# Altium PCB Orion-Bridge-R4.PcbDoc (part 1 of 2)
Units mil, origin at the board's own origin, x right, y up, seen from the top; angles counter-clockwise.
Board outline 1889.76 x 1259.84 mil, 2 copper layers (Top Layer, Bottom Layer), stack 62.992 mil thick; 52 components, 35 nets, 164 pads, 41 vias.
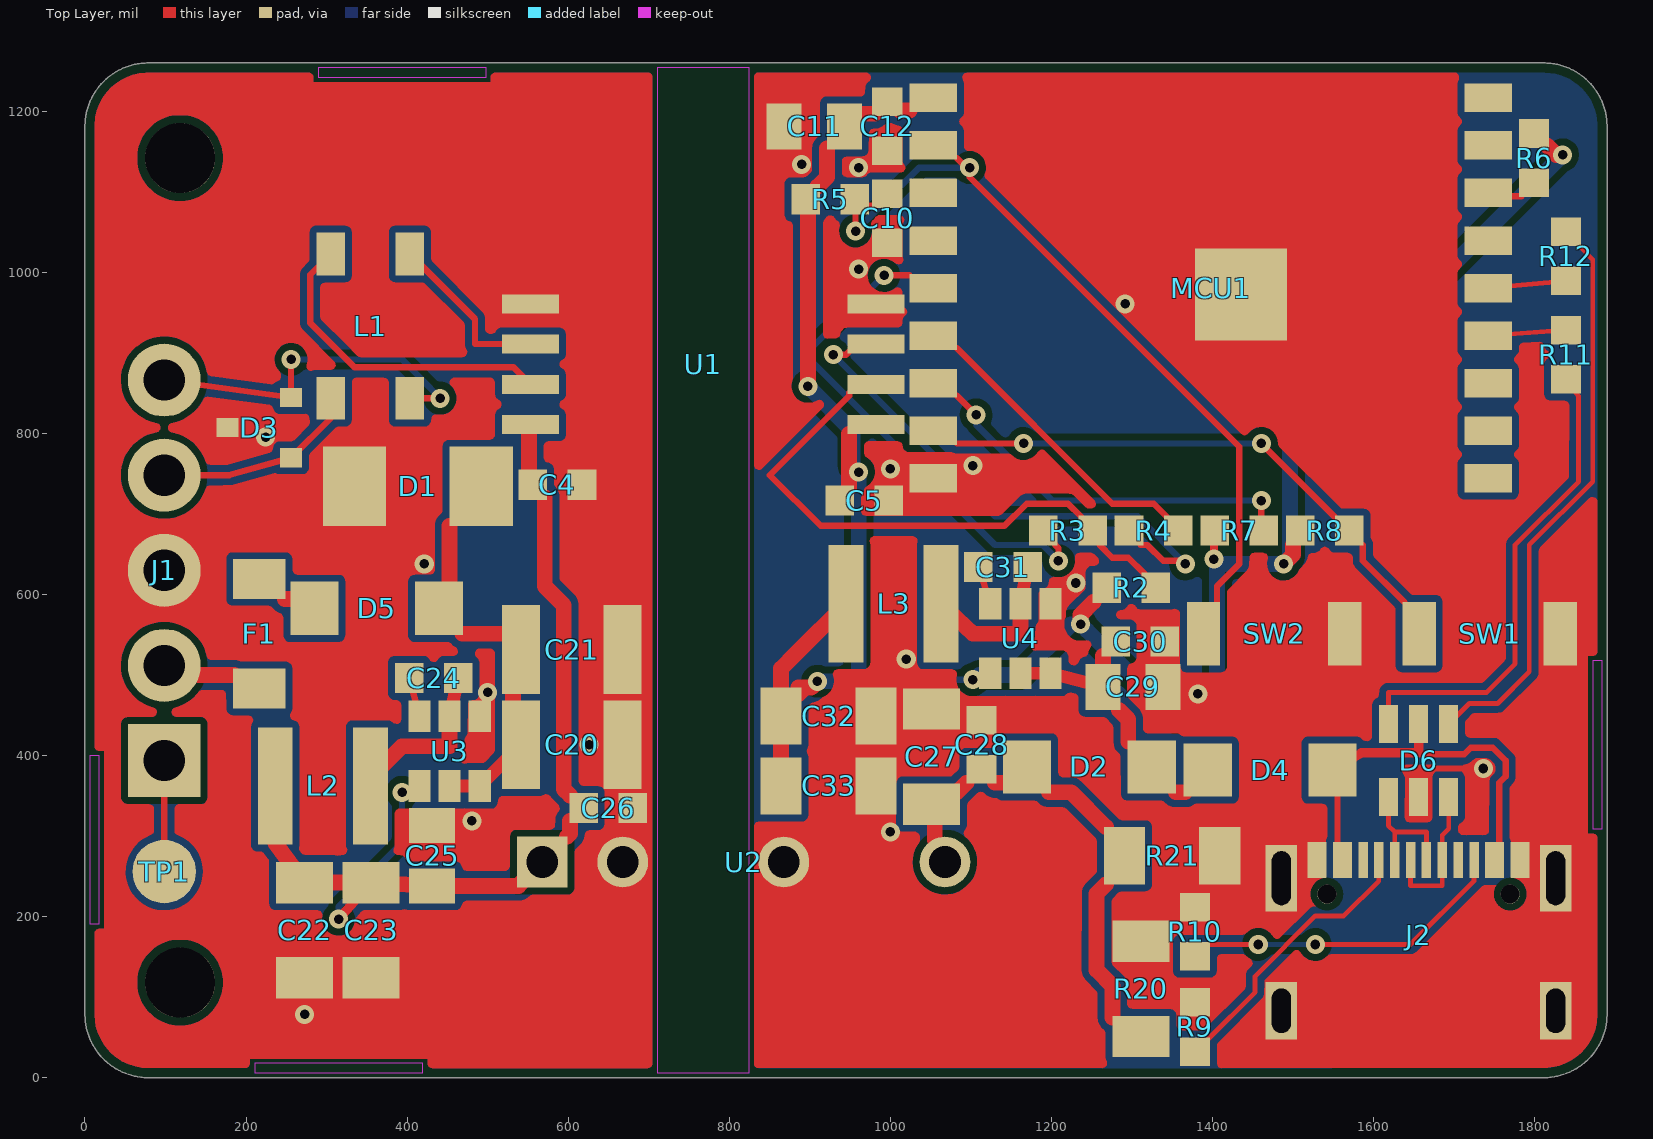
[diagram p0: Top Layer view]
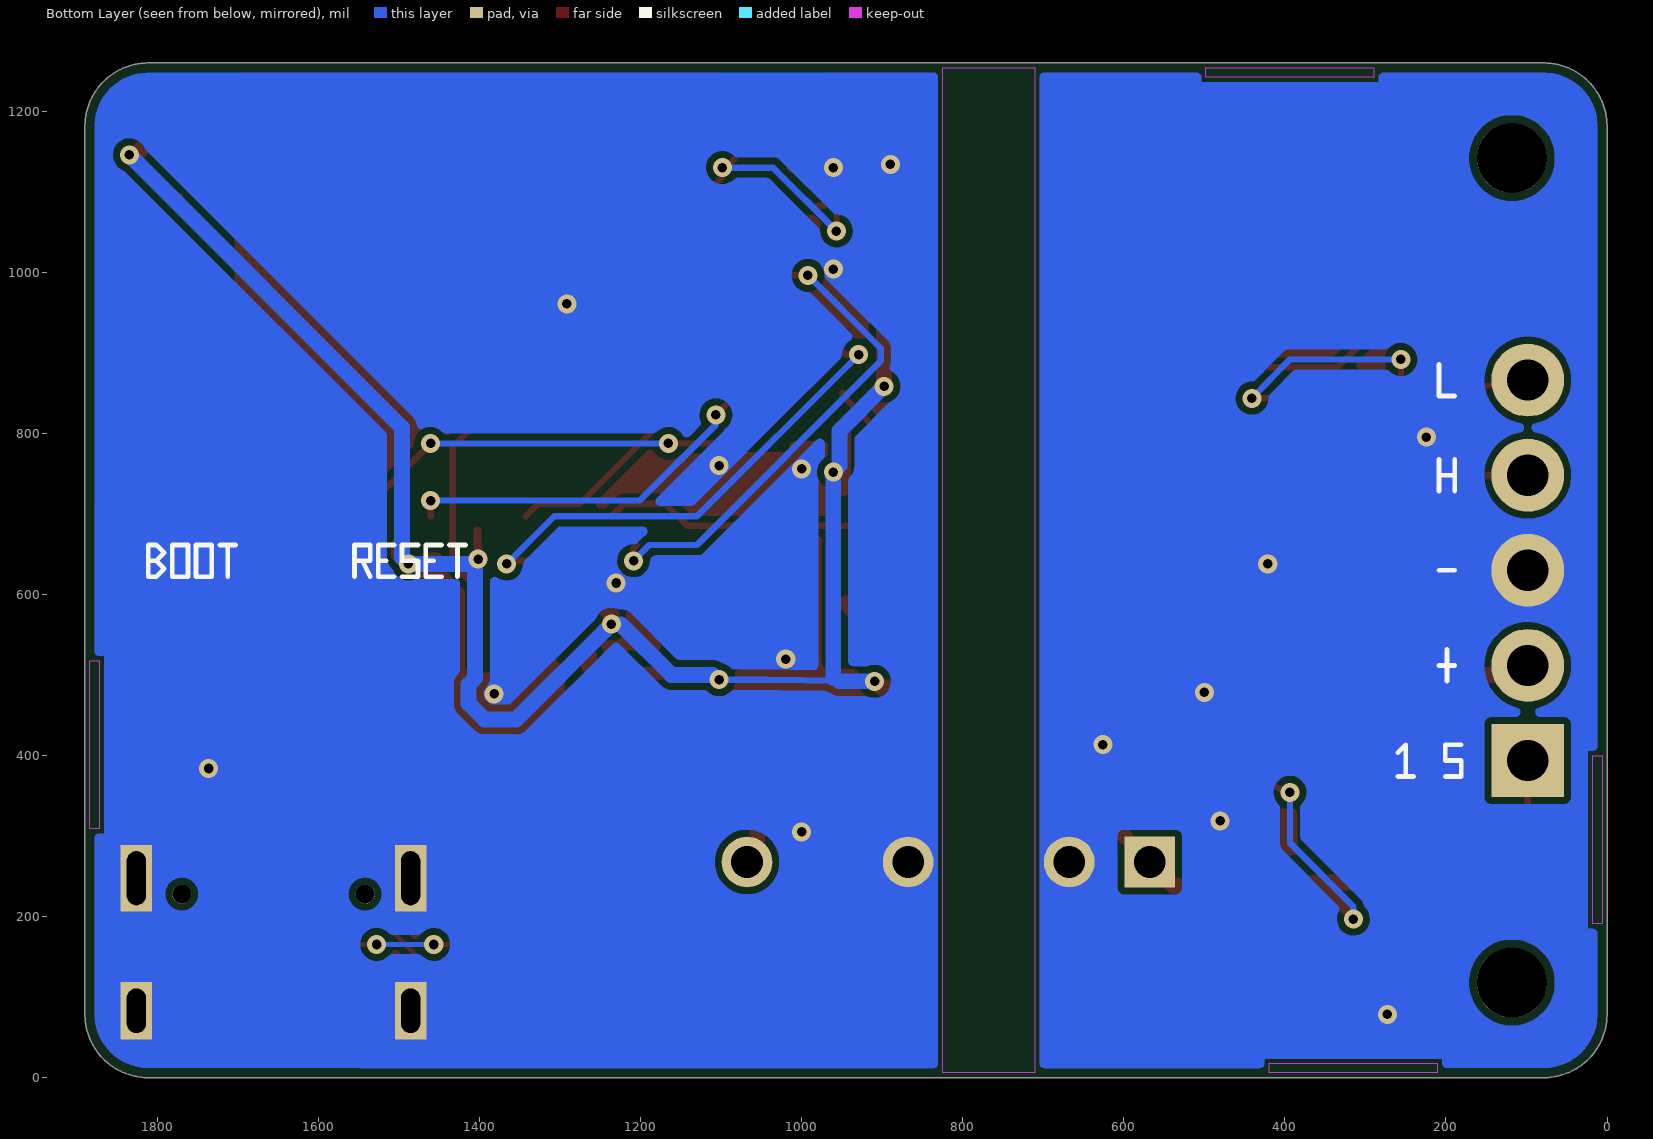
[diagram p1: Bottom Layer view, seen from below]

## Layer stack, top to bottom
Top Solder: solder mask 0.3937, Solder Resist, Dk 3.5
Top Layer: signal copper 1.378
Dielectric1: dielectric 60.2362, FR-4, Dk 4.3
Bottom Layer: signal copper 1.378
Bottom Solder: solder mask 0.3937, Solder Resist, Dk 3.5

## Board outline
1811.02,0 1812.96,0.02 1814.89,0.09 1816.82,0.21 1818.74,0.38 1820.66,0.59 1822.58,0.85 1824.49,1.16 1826.39,1.51 1828.28,1.91 1830.16,2.36 1832.02,2.85 1833.88,3.39 1835.72,3.97 1837.55,4.6 1839.36,5.28 1841.16,5.99 1842.93,6.76 1844.69,7.56 1846.43,8.41 1848.14,9.3 1849.83,10.23 1851.5,11.2 1853.15,12.22 1854.77,13.27 1856.36,14.36 1857.93,15.5 1859.47,16.67 1860.98,17.87 1862.45,19.12 1863.9,20.4 1865.32,21.71 1866.7,23.06 1868.05,24.45 1869.37,25.86 1870.65,27.31 1871.89,28.79 1873.1,30.3 1874.27,31.83 1875.4,33.4 1876.49,34.99 1877.55,36.61 1878.56,38.26 1879.53,39.93 1880.47,41.62 1881.36,43.34 1882.2,45.07 1883.01,46.83 1883.77,48.61 1884.49,50.4 1885.16,52.21 1885.79,54.04 1886.37,55.88 1886.91,57.74 1887.4,59.61 1887.85,61.49 1888.25,63.38 1888.6,65.28 1888.91,67.19 1889.17,69.1 1889.38,71.02 1889.55,72.95 1889.67,74.88 1889.74,76.81 1889.76,78.74 1889.76,1181.1 1889.74,1183.03 1889.67,1184.97 1889.55,1186.89 1889.38,1188.82 1889.17,1190.74 1888.91,1192.66 1888.6,1194.56 1888.25,1196.46 1887.85,1198.35 1887.4,1200.23 1886.91,1202.1 1886.37,1203.96 1885.79,1205.8 1885.16,1207.63 1884.49,1209.44 1883.77,1211.23 1883.01,1213.01 1882.2,1214.77 1881.36,1216.5 1880.47,1218.22 1879.53,1219.91 1878.56,1221.58 1877.55,1223.23 1876.49,1224.85 1875.4,1226.44 1874.27,1228.01 1873.1,1229.55 1871.89,1231.05 1870.65,1232.53 1869.37,1233.98 1868.05,1235.4 1866.7,1236.78 1865.32,1238.13 1863.9,1239.44 1862.45,1240.73 1860.98,1241.97 1859.47,1243.18 1857.93,1244.35 1856.36,1245.48 1854.77,1246.57 1853.15,1247.63 1851.5,1248.64 1849.83,1249.61 1848.14,1250.55 1846.43,1251.43 1844.69,1252.28 1842.93,1253.09 1841.16,1253.85 1839.36,1254.57 1837.55,1255.24 1835.72,1255.87 1833.88,1256.45 1832.02,1256.99 1830.16,1257.48 1828.28,1257.93 1826.39,1258.33 1824.49,1258.68 1822.58,1258.99 1820.66,1259.25 1818.74,1259.46 1816.82,1259.63 1814.89,1259.75 1812.96,1259.82 1811.02,1259.84 78.74,1259.84 76.81,1259.82 74.88,1259.75 72.95,1259.63 71.02,1259.46 69.1,1259.25 67.19,1258.99 65.28,1258.68 63.38,1258.33 61.49,1257.93 59.61,1257.48 57.74,1256.99 55.88,1256.45 54.04,1255.87 52.21,1255.24 50.4,1254.57 48.61,1253.85 46.83,1253.09 45.07,1252.28 43.34,1251.43 41.62,1250.55 39.93,1249.61 38.26,1248.64 36.61,1247.63 34.99,1246.57 33.4,1245.48 31.83,1244.35 30.3,1243.18 28.79,1241.97 27.31,1240.73 25.86,1239.44 24.45,1238.13 23.06,1236.78 21.71,1235.4 20.4,1233.98 19.12,1232.53 17.87,1231.05 16.67,1229.55 15.5,1228.01 14.36,1226.44 13.27,1224.85 12.22,1223.23 11.2,1221.58 10.23,1219.91 9.3,1218.22 8.41,1216.5 7.56,1214.77 6.76,1213.01 5.99,1211.23 5.28,1209.44 4.6,1207.63 3.97,1205.8 3.39,1203.96 2.85,1202.1 2.36,1200.23 1.91,1198.35 1.51,1196.46 1.16,1194.56 0.85,1192.66 0.59,1190.74 0.38,1188.82 0.21,1186.89 0.09,1184.97 0.02,1183.03 0,1181.1 0,78.74 0.02,76.81 0.09,74.88 0.21,72.95 0.38,71.02 0.59,69.1 0.85,67.19 1.16,65.28 1.51,63.38 1.91,61.49 2.36,59.61 2.85,57.74 3.39,55.88 3.97,54.04 4.6,52.21 5.28,50.4 5.99,48.61 6.76,46.83 7.56,45.07 8.41,43.34 9.3,41.62 10.23,39.93 11.2,38.26 12.22,36.61 13.27,34.99 14.36,33.4 15.5,31.83 16.67,30.3 17.87,28.79 19.12,27.31 20.4,25.86 21.71,24.45 23.06,23.06 24.45,21.71 25.86,20.4 27.31,19.12 28.79,17.87 30.3,16.67 31.83,15.5 33.4,14.36 34.99,13.27 36.61,12.22 38.26,11.2 39.93,10.23 41.62,9.3 43.34,8.41 45.07,7.56 46.83,6.76 48.61,5.99 50.4,5.28 52.21,4.6 54.04,3.97 55.88,3.39 57.74,2.85 59.61,2.36 61.49,1.91 63.38,1.51 65.28,1.16 67.19,0.85 69.1,0.59 71.02,0.38 72.95,0.21 74.88,0.09 76.81,0.02 78.74,0

## Design rules (kind name [scope] priority, off if disabled: settings)
BoardOutlineClearance BoardEdge_0_30mm [All] p1: gap=11.81 ignorepadtopadclearanceinfootprint=FALSE
Clearance Isolation_BUS_LOGIC [InNet('5V_BUS') Or InNet('BST_BUS') Or InNet('BUS_PROT') Or InNet('CANH') Or InNet('CANH_EXT') Or InNet('CANL') Or InNet('CANL_EXT') Or InNet('FUSED_IN') Or InNet('GND_BUS') Or InNet('NET_S') Or InNet('SHIELD') Or InNet('SW_BUS') vs InNet('3V3_LOGIC') Or InNet('5V_ISO') Or InNet('5V_SYS') Or InNet('BST_LOGIC') Or InNet('ESP_BOOT') Or InNet('ESP_EN') Or InNet('ESP_GPIO2') Or InNet('ESP_GPIO8') Or InNet('GND_LOGIC') Or InNet('GPIO6') Or InNet('GPIO7') Or InNet('RXD') Or InNet('SW_LOGIC') Or InNet('TXD') Or InNet('USB_CC1') Or InNet('USB_CC2') Or InNet('USB_DM') Or InNet('USB_DM_IN') Or InNet('USB_DM_MCU') Or InNet('USB_DP') Or InNet('USB_DP_IN') Or InNet('USB_DP_MCU') Or InNet('USB_VBUS')] p1: gap=125.98 ignorepadtopadclearanceinfootprint=FALSE
Clearance Mounting_NPTH [IsPad And (HoleSize > 0) And (PadIsPlated = 'False') And (Not InComponent('J2'))] p2: gap=9.84 ignorepadtopadclearanceinfootprint=FALSE
Clearance USB_Alignment_NPTH [IsPad And (HoleSize > 0) And (PadIsPlated = 'False') And InComponent('J2')] p3: gap=7.87 ignorepadtopadclearanceinfootprint=FALSE
Clearance [All] p4: gap=5.91 ignorepadtopadclearanceinfootprint=FALSE
ComponentClearance [All] p1: gap=9.84 collisioncheckmode=3 verticalgap=9.84 showdistances=FALSE
HoleSize [All] p1: absolutevalues=TRUE maxlimit=248.03 minlimit=11.81 maxpercent=80.000 minpercent=20.000
HoleToHoleClearance [All] p1: gap=9.84 allowstackedmicrovias=FALSE
MinimumAnnularRing PTH_AnnularRing [IsPad And (PadIsPlated = 'True')] p1: minimumring=7.09
MinimumAnnularRing Via_AnnularRing [IsVia] p2: minimumring=5.91
MinimumSolderMaskSliver [All] p1: minsoldermaskwidth=3.94
PasteMaskExpansion Paste_1to1 [All] p1: expansion=0
PolygonConnect [All] p1: connectstyle=Relief reliefconductorwidth=10 reliefentries=4 polygonreliefangle="90 Angle" airgapwidth=10
RoutingVias [All] p1: holewidth=11.81 width=23.62 viastyle="Through Hole" minholewidth=11.81 minwidth=23.62 maxholewidth=11.81 maxwidth=23.62
SilkToSilkClearance SilkToSilk [All] p1: silktosilkclearance=3.94
SilkToSolderMaskClearance SilkToMask_0_15mm [IsPad] p1: minsilkscreentomaskgap=5.91 clearancetoexposedcopper=FALSE
SolderMaskExpansion TentedVias [IsVia] p1: expansion=-11.81 istentingtop=TRUE
SolderMaskExpansion PadSolderMask [All] p2: expansion=1.97 istentingtop=FALSE
SupplyNets "Schematic Supply Nets_1" [InNet('GND_BUS')] p1: voltage=0.000
SupplyNets "Schematic Supply Nets" [InNet('GND_LOGIC')] p2: voltage=0.000
Width USB_FullSpeed [InNet('USB_CC1') Or InNet('USB_CC2') Or InNet('USB_DM') Or InNet('USB_DM_IN') Or InNet('USB_DM_MCU') Or InNet('USB_DP') Or InNet('USB_DP_IN') Or InNet('USB_DP_MCU')] p1: maxlimit=19.68 minlimit=5.91 preferedwidth=5.91
Width [All] p2: maxlimit=78.74 minlimit=7.87 preferedwidth=11.81
23 further rules are at their usual default settings.

## Classes and differential pairs
component class Orion-Bridge-R4-Power: C20 C21 C22 C23 C24 C25 C26 C27 C28 C29 C30 C31 C32 C33 D1 D2 D4 D5 F1 J1 L2 L3 R20 R21 TP1 U2 U3 U4
component class Orion-Bridge-R4-Logic: C4 C5 C10 C11 C12 D3 D6 J2 L1 MCU1 R2 R3 R4 R5 R6 R7 R8 R9 R10 R11 R12 SW1 SW2 U1

## Components (designator, comment, footprint, x,y, rotation, side; value= is the part's Value field where it differs from the comment)
C4 "100nF 50V X7R" C0603#1 586.61,736.22 r0 top
C5 "100nF 50V X7R" C0603#2 967.52,716.54 r0 top
C10 "1uF 50V X5R" C0603#2 996.06,1066.93 r270 top
C11 "10uF 25V X5R" C0805 905.51,1181.1 r180 top
C12 "100nF 50V X7R" C0603#2 996.06,1181.1 r270 top
C20 "10uF 50V X7R" C1210#1 604.33,413.39 r0 top
C21 "10uF 50V X7R" C1210#2 604.33,531.5 r0 top
C22 "22uF 25V X5R" C1206 272.64,183.07 r270 top
C23 "22uF 25V X5R" C1206 355.31,183.07 r270 top
C24 "100nF 50V X7R" C0603#2 433.07,496.06 r0 top
C25 "10uF 25V X5R" C0805 431.1,275.59 r90 top
C26 "100nF 50V X7R" C0603#3 649.61,334.65 r0 top
C27 "22uF 25V X5R" C1206 1051.18,398.62 r90 top
C28 "100nF 50V X7R" C0603#4 1113.19,413.39 r90 top
C29 "10uF 25V X5R" C0805 1301.18,485.24 r0 top
C30 "100nF 50V X7R" C0603#2 1310.04,541.34 r0 top
C31 "100nF 50V X7R" C0603#5 1139.76,633.86 r0 top
C32 "22uF 25V X5R" C1206 923.23,448.82 r0 top
C33 "22uF 25V X5R" C1206 923.23,362.2 r0 top
D1 "SMBJ18A 600W" SMB 413.39,734.25 r180 top
D2 "SS14 1A 40V" SMA#1 1247.05,385.83 r180 top
D3 "PESD2CAN24T-Q" SOT23_NEXPERIA_REFLOW 216.54,807.09 r90 top
D4 "SS14 1A 40V" SMA#1 1471.46,381.89 r0 top
D5 "SS26 2A 60V" SMA#2 362.2,582.68 r180 top
D6 "USBLC6-2SC6" SOT23_6_ST_USBLC6 1655.71,393.7 r0 top
F1 "T0.8A 63VDC" BOURNS_SF1206S 216.54,551.18 r90 top
J1 "NMEA Micro-C pigtail" PIGTAIL_5_P3_D1P3 98.43,629.92 r180 top
J2 "TYPE-C-31-M-12" USB_C_HRO_TYPE_C_31_M_12_2020 1655.71,125.59 r0 top
L1 "ACT45B-510-2P-TL003" ACT45B 354.33,933.07 r90 top
L2 "4.7uH" SUNLORD_SWPA4030 295.28,362.2 r180 top
L3 "4.7uH" SUNLORD_SWPA4030 1003.94,588.58 r180 top
MCU1 "ESP32-C3-WROOM-02-N4" ESP32_C3_WROOM_02 1397.64,1102.36 r0 top
R2 "10k 1% 0.1W" R0603 1299.21,608.27 r0 top
R3 "33R" R0603 1220.47,679.13 r0 top
R4 "33R" R0603 1326.77,679.13 r0 top
R5 "10k 1% 0.1W" R0603 925.2,1090.55 r0 top
R6 "10k 1% 0.1W" R0603 1799.21,1141.73 r270 top
R7 "10k 1% 0.1W" R0603 1433.07,679.13 r0 top
R8 "10k 1% 0.1W" R0603 1539.37,679.13 r0 top
R9 "5.1k 1% 0.1W" R0603 1377.95,62.99 r90 top
R10 "5.1k 1% 0.1W" R0603 1377.95,181.1 r90 top
R11 "22R 1% 0.1W" R0603 1838.58,897.64 r90 top
R12 "22R 1% 0.1W" R0603 1838.58,1019.68 r270 top
R20 "150R 1% 0.5W" R1206 1311.02,110.24 r90 top
R21 "150R 1% 0.5W" R1206 1349.8,275.59 r0 top
SW1 "TS-1088-AR02016" SW_XUNPU_TS1088_AR 1744.09,551.18 r0 top
SW2 "TS-1088-AR02016" SW_XUNPU_TS1088_AR 1476.38,551.18 r0 top
TP1 "Shield / chassis pad" TESTPOINT_2MM 98.43,255.91 r0 top
U1 "ISO1042DWV" SOIC8_DWV 767.72,885.83 r180 top
U2 "B0505S-3WR2" EVISUN_B0505S_3WR2 867.52,165.35 r0 top
U3 "AP63205WU-7" TSOT26_DIODES 452.76,405.51 r0 top
U4 "AP63203WU-7" TSOT26_DIODES 1161.42,545.28 r0 top

## Footprints (in the part's own frame and the unit in brackets; to place one, negate y for a bottom-side part, rotate by r counter-clockwise, add the part's x,y. Pads: shape width x height; smd on the part's side, far side on the other; paste and mask are expansions set on the pad)
ACT45B [mm] "TDK ACT45B recommended lands; windings 1-4 and 2-3"
  rect 1.35x0.9 smd: 1(-2.275,1.25) 2(-2.275,-1.25) 3(2.275,-1.25) 4(2.275,1.25)
  body extent -2.53,-1.6 2.52,1.6, height 2.8
BOURNS_SF1206S [mm] "Bourns SF-1206S recommended land pattern: total X span 4.7, inner gap 2.2, pad Y 1.65; maximum body envelope. No polarity."
  rect 1.25x1.65 smd: 1(-1.725,0)
  rect 1.25x1.65 smd mask+0.02: 2(1.725,0)
  body extent -1.6,-0.83 1.6,0.83, height 0.71
C0603#1 [mm] "IPC-style 0603 solder lands; selected MPN dimensions reviewed separately."
  rect 0.9x0.95 smd mask+0.015: 1(-0.775,0)
  rect 0.9x0.95 smd: 2(0.775,0)
  body extent -0.8,-0.41 0.8,0.41, height 0.81
C0603#2 [mm] "IPC-style 0603 solder lands; selected MPN dimensions reviewed separately."
  rect 0.9x0.95 smd: 1(-0.775,0) 2(0.775,0)
  body extent -0.8,-0.41 0.8,0.41, height 0.81
C0603#3 [mm] "IPC-style 0603 solder lands; selected MPN dimensions reviewed separately."
  rect 0.9x0.95 smd mask+0.01: 1(-0.775,0) 2(0.775,0)
  body extent -0.8,-0.41 0.8,0.41, height 0.81
C0603#4 [mm] "IPC-style 0603 solder lands; selected MPN dimensions reviewed separately."
  rect 0.9x0.95 smd: 1(-0.775,0)
  rect 0.9x0.95 smd mask+0.025: 2(0.775,0)
  body extent -0.8,-0.41 0.8,0.41, height 0.81
C0603#5 [mm] "IPC-style 0603 solder lands; selected MPN dimensions reviewed separately."
  rect 0.9x0.95 smd mask+0.015: 1(-0.775,0) 2(0.775,0)
  body extent -0.8,-0.41 0.8,0.41, height 0.81
C0805 [mm] "IPC-style 0805 solder lands; selected MPN dimensions reviewed separately."
  rect 1.1x1.45 smd: 1(-0.95,0) 2(0.95,0)
  body extent -1,-0.63 1,0.63, height 0.81
C1206 [mm] "IPC-style 1206 solder lands; selected MPN dimensions reviewed separately."
  rect 1.3x1.8 smd: 1(-1.5,0) 2(1.5,0)
  body extent -1.6,-0.81 1.6,0.81, height 1.52
C1210#1 [mm] "Samsung CL32B106KBJNNNE body3.2x2.5mm, nominal1210 land pattern selected."
  rect 1.2x2.8 smd: 1(-1.6,0)
  rect 1.2x2.8 smd mask+0.01: 2(1.6,0)
  body extent -1.6,-1.26 1.6,1.26, height 2.72
C1210#2 [mm] "Samsung CL32B106KBJNNNE body3.2x2.5mm, nominal1210 land pattern selected."
  rect 1.2x2.8 smd: 1(-1.6,0) 2(1.6,0)
  body extent -1.6,-1.26 1.6,1.26, height 2.72
ESP32_C3_WROOM_02 [mm] "Espressif WROOM-02 v1.7 Fig11-1. EP19 ground copper with NO paste; optional EP left unsoldered per manufacturer."
  rect 1.5x0.9 smd: 1(-8.75,2.9) 2(-8.75,1.4) 3(-8.75,-0.1) 4(-8.75,-1.6) 9(-8.75,-9.1) 10(8.75,-9.1) 11(8.75,-7.6) 12(8.75,-6.1) 13(8.75,-4.6) 14(8.75,-3.1) 15(8.75,-1.6) 16(8.75,-0.1) 17(8.75,1.4) 18(8.75,2.9)
  rect 1.5x0.9 smd mask+0.02: 5(-8.75,-3.1) 6(-8.75,-4.6) 7(-8.75,-6.1) 8(-8.75,-7.6)
  rect 2.9x2.9 smd paste-10: 19(0.96,-3.3)
  body extent -9,-10 9,10, height 3.35
EVISUN_B0505S_3WR2 [mm] "EVISUN p4: nominal19.65x7x10.16mm, unspecified body tolerance+/-0.25mm, lead1 x=2.21 from body left, pitch1-2=2.54/2-4=5.08/4-6=5.08mm. Pin row .90mm from long body edge. Bottom view mirrored vertically to PCB TOP: row Y=+2.60mm. Finished holes1.00mm, annulus.30mm. Primary/secondary pad copper gap3.48mm."
  rect 1.6x1.6 hole 1 paste-2539.97: 1(-7.615,2.6)
  round 1.6 hole 1 paste-2539.97: 2(-5.075,2.6) 4(0.005,2.6) 6(5.085,2.6)
  body extent -9.82,-3.5 9.82,3.5, height 10.33
PIGTAIL_5_P3_D1P3 [mm] "Designed carrier wire-solder interface, 3.0 pitch, 1.3 finished-hole target, 0.5 radial annulus. Pin numbering is logical NMEA: 1 shield, 2 NET-S, 3 NET-C, 4 CAN-H, 5 CAN-L. Cable and strain relief still require a physical selection."
  rect 2.3x2.3 hole 1.3 paste-2539.97: 1(0,6)
  round 2.3 hole 1.3 paste-2539.97: 2(0,3) 3(0,0) 4(0,-3) 5(0,-6)
  body extent -1.15,-7.15 1.15,7.15, height 0.06
R0603 [mm] "IPC-style 0603 solder lands; selected MPN dimensions reviewed separately."
  rect 0.9x0.95 smd: 1(-0.775,0) 2(0.775,0)
  body extent -0.8,-0.41 0.8,0.41, height 0.81
R1206 [mm] "IPC-style 1206 solder lands; selected MPN dimensions reviewed separately."
  rect 1.3x1.8 smd: 1(-1.5,0) 2(1.5,0)
  body extent -1.6,-0.81 1.6,0.81, height 1.52
SMA#1 [mm] "MDD SS12-SS1200 Rev2025A3 p3 / SS22-SS2200 Rev2024A4 p3 suggested SMA pattern: pad1.52x1.68, centrepitch3.93, innergap2.41, totalX5.45mm. Maxbody4.5x2.8x2.45; pin1Kleft,2Aright. Visually checked selected C2480/C14238 PDFs."
  rect 1.52x1.68 smd: 1(-1.965,0) 2(1.965,0)
  body extent -2.54,-1.4 2.54,1.4, height 2.46
SMA#2 [mm] "MDD SS12-SS1200 Rev2025A3 p3 / SS22-SS2200 Rev2024A4 p3 suggested SMA pattern: pad1.52x1.68, centrepitch3.93, innergap2.41, totalX5.45mm. Maxbody4.5x2.8x2.45; pin1Kleft,2Aright. Visually checked selected C2480/C14238 PDFs."
  rect 1.52x1.68 smd: 1(-1.965,0)
  rect 1.52x1.68 smd mask+0.02: 2(1.965,0)
  body extent -2.54,-1.4 2.54,1.4, height 2.46
SMB [mm] "BORN SMBJ Series Rev2022-Jan-1-A p7 manufacturer pattern: pad2.0x2.5mm, innergap2.0mm, centres+/-2.0mm; maxbody4.7x3.9x2.5; pin1Kleft,2Aright. Visually checked selected C152104 PDF."
  rect 2x2.5 smd: 1(-2,0) 2(2,0)
  body extent -2.58,-1.95 2.57,1.95, height 2.51
SOIC8_DWV [mm] "TI DWV0008A manufacturer land pattern; pin 1 upper left"
  rect 1.8x0.6 smd mask+0.02: 1(-5.45,1.905) 2(-5.45,0.635) 3(-5.45,-0.635) 4(-5.45,-1.905)
  rect 1.8x0.6 smd: 5(5.45,-1.905) 6(5.45,-0.635) 7(5.45,0.635) 8(5.45,1.905)
  body extent -5.7,-2.93 5.7,2.93, height 2.82
SOT23_6_ST_USBLC6 [mm] "ST USBLC6-2 datasheet Fig22 p12; visually checked manufacturer recommended land pattern."
  rect 0.6x1.2 smd: 1(-0.95,-1.15) 2(0,-1.15) 3(0.95,-1.15) 4(0.95,1.15) 5(0,1.15) 6(-0.95,1.15)
  body extent -1.53,-1.4 1.52,1.4, height 1.47
SOT23_NEXPERIA_REFLOW [mm] "Nexperia SOT23 reflow footprint Fig10: 0.6 x 0.7 copper lands, 1.9 pin pitch and 2.0 row centres. Drawing is rotated 180 degrees to match existing top-view pin1 lower left, pin2 lower right, pin3 upper centre. Paste suggested0.5 x0.6, mask opening1.0 x1.0; set fabrication-specific expansions accordingly."
  rect 0.6x0.7 smd: 1(-0.95,-1) 2(0.95,-1) 3(0,1)
  body extent -1.5,-1.25 1.5,1.25, height 1.11
SUNLORD_SWPA4030 [mm] "Sunlord SWPA datasheet2025-05-08 p2 recommended SWPA4030S pattern: gap1.9, padwidth1.1, padheight3.7."
  rect 1.1x3.7 smd: 1(-1.5,0) 2(1.5,0)
  body extent -2,-2 2,2, height 3.02
SW_XUNPU_TS1088_AR [mm] "XUNPU TS-1088-ARXXXXXX manufacturer drawing: outer width5.50, inner gap3.40, padheight2.00; two terminals, no locating posts."
  rect 1.05x2 smd: 1(-2.225,0) 2(2.225,0)
  body extent -2.68,-1.5 2.67,1.5, height 2
TESTPOINT_2MM [mm] "2 mm exposed top-copper test pad; no paste"
  round 2 smd paste-10: 1(0,0)
  body extent -1,-1 1,1, height 0.06
TSOT26_DIODES [mm] "Diodes DS41326 Rev3-2 p17 suggested TSOT26 copper: X=.70,Y=1.00,Y1=3.20 total span,C=.95. Top view: pin1 lower-left; pin4 upper-right."
  rect 0.7x1 smd: 1(-0.95,-1.1) 2(0,-1.1) 3(0.95,-1.1) 4(0.95,1.1) 5(0,1.1) 6(-0.95,1.1)
  body extent -1.5,-1.35 1.5,1.35, height 1.01
USB_C_HRO_TYPE_C_31_M_12_2020 [mm] "HRO drawing dated2020-12-08 downloaded via JLC C165948. NOT older2018 KiCad footprint: updated front slots1.4, padwidth centres3.20/2.40 and padheight1.14. Body envelope3D is nominal. Shield copper enlarged by0.05mm peredge from manufacturer recommendation to provide0.20mm annular ring; drills unchanged."
  rect 0.6x1.14 smd: A1_B12(-3.2,3.67) A4_B9(-2.4,3.67) B1_A12(3.2,3.67) B4_A9(2.4,3.67)
  rect 0.3x1.14 smd: A5(-1.25,3.67) A6(-0.25,3.67) A7(0.25,3.67) A8(1.25,3.67) B5(1.75,3.67) B6(0.75,3.67) B7(-0.75,3.67) B8(-1.75,3.67)
  rect 1x2.1 hole 0.6 slot 1.7 at 90 deg paste-2539.97: S1(-4.325,3.1) S2(4.325,3.1)
  rect 1x1.8 hole 0.6 slot 1.4 at 90 deg paste-2539.97: S3(-4.325,-1.08) S4(4.325,-1.08)
  round 0.6 hole 0.6 unplated paste-2539.97 mask+0.05: ""(-2.89,2.6) ""(2.89,2.6)
  body extent -4.47,-3.68 4.47,4.14, height 3.26

## Part data
C4: library part R4_C4_100nF, "100nF 16V X7R - generic specification; manufacturer/MPN not selected", Manufacturer=YAGEO, Manufacturer Part Number=CC0603KRX7R9BB104, Supplier Part Number 1=C14663, Datasheet=https://www.lcsc.com/datasheet/lcsc_datasheet_2211101700_YAGEO-CC0603KRX7R9BB104_C14663.pdf, Footprint Status="R4 reviewed package; see source and assembly audit", MPN=CC0603KRX7R9BB104, ReviewStatus="R4 reviewed package; see source and assembly audit", Supplier 1=LCSC
C5: library part R4_C5_100nF, "100nF 16V X7R - generic specification; manufacturer/MPN not selected", Manufacturer=YAGEO, Manufacturer Part Number=CC0603KRX7R9BB104, Supplier Part Number 1=C14663, Datasheet=https://www.lcsc.com/datasheet/lcsc_datasheet_2211101700_YAGEO-CC0603KRX7R9BB104_C14663.pdf, Footprint Status="R4 reviewed package; see source and assembly audit", MPN=CC0603KRX7R9BB104, ReviewStatus="R4 reviewed package; see source and assembly audit", Supplier 1=LCSC
C10: library part R4_C10_1uF, Manufacturer="Samsung Electro-Mechanics", Manufacturer Part Number=CL10A105KB8NNNC, Supplier Part Number 1=C15849, Datasheet=https://www.lcsc.com/datasheet/lcsc_datasheet_2304140030_Samsung-Electro-Mechanics-CL10A105KB8NNNC_C15849.pdf, Footprint Status="R4 reviewed package; see source and assembly audit", MPN=CL10A105KB8NNNC, ReviewStatus="R4 reviewed package; see source and assembly audit", Supplier 1=LCSC
C11: library part R4_C11_10uF, Manufacturer="Samsung Electro-Mechanics", Manufacturer Part Number=CL21A106KAYNNNE, Supplier Part Number 1=C15850, Datasheet=https://www.lcsc.com/datasheet/lcsc_datasheet_2304140030_Samsung-Electro-Mechanics-CL21A106KAYNNNE_C15850.pdf, Footprint Status="R4 reviewed package; see source and assembly audit", MPN=CL21A106KAYNNNE, ReviewStatus="R4 reviewed package; see source and assembly audit", Supplier 1=LCSC
C12: library part R4_C12_100nF, Manufacturer=YAGEO, Manufacturer Part Number=CC0603KRX7R9BB104, Supplier Part Number 1=C14663, Datasheet=https://www.lcsc.com/datasheet/lcsc_datasheet_2211101700_YAGEO-CC0603KRX7R9BB104_C14663.pdf, Footprint Status="R4 reviewed package; see source and assembly audit", MPN=CC0603KRX7R9BB104, ReviewStatus="R4 reviewed package; see source and assembly audit", Supplier 1=LCSC
C20: library part R4_C20_10uF, Manufacturer="Samsung Electro-Mechanics", Manufacturer Part Number=CL32B106KBJNNNE, Supplier Part Number 1=C138687, Datasheet=https://datasheet.lcsc.com/lcsc/1912112237_Samsung-Electro-Mechanics-CL32B106KBJNNNE_C138687.pdf, Footprint Status="R4 reviewed package; see source and assembly audit", MPN=CL32B106KBJNNNE, ReviewStatus="R4 reviewed package; see source and assembly audit", Supplier 1=LCSC
C21: library part R4_C21_10uF, Manufacturer="Samsung Electro-Mechanics", Manufacturer Part Number=CL32B106KBJNNNE, Supplier Part Number 1=C138687, Datasheet=https://datasheet.lcsc.com/lcsc/1912112237_Samsung-Electro-Mechanics-CL32B106KBJNNNE_C138687.pdf, Footprint Status="R4 reviewed package; see source and assembly audit", MPN=CL32B106KBJNNNE, ReviewStatus="R4 reviewed package; see source and assembly audit", Supplier 1=LCSC
C22: library part R4_C22_22uF, Manufacturer="Samsung Electro-Mechanics", Manufacturer Part Number=CL31A226KAHNNNE, Supplier Part Number 1=C12891, Datasheet=https://www.lcsc.com/datasheet/lcsc_datasheet_2304140030_Samsung-Electro-Mechanics-CL31A226KAHNNNE_C12891.pdf, Footprint Status="R4 reviewed package; see source and assembly audit", MPN=CL31A226KAHNNNE, ReviewStatus="R4 reviewed package; see source and assembly audit", Supplier 1=LCSC
C23: library part R4_C23_22uF, Manufacturer="Samsung Electro-Mechanics", Manufacturer Part Number=CL31A226KAHNNNE, Supplier Part Number 1=C12891, Datasheet=https://www.lcsc.com/datasheet/lcsc_datasheet_2304140030_Samsung-Electro-Mechanics-CL31A226KAHNNNE_C12891.pdf, Footprint Status="R4 reviewed package; see source and assembly audit", MPN=CL31A226KAHNNNE, ReviewStatus="R4 reviewed package; see source and assembly audit", Supplier 1=LCSC
C24: library part R4_C24_100nF, Manufacturer=YAGEO, Manufacturer Part Number=CC0603KRX7R9BB104, Supplier Part Number 1=C14663, Datasheet=https://www.lcsc.com/datasheet/lcsc_datasheet_2211101700_YAGEO-CC0603KRX7R9BB104_C14663.pdf, Footprint Status="R4 reviewed package; see source and assembly audit", MPN=CC0603KRX7R9BB104, ReviewStatus="R4 reviewed package; see source and assembly audit", Supplier 1=LCSC
C25: library part R4_C25_10uF, Manufacturer="Samsung Electro-Mechanics", Manufacturer Part Number=CL21A106KAYNNNE, Supplier Part Number 1=C15850, Datasheet=https://www.lcsc.com/datasheet/lcsc_datasheet_2304140030_Samsung-Electro-Mechanics-CL21A106KAYNNNE_C15850.pdf, Footprint Status="R4 reviewed package; see source and assembly audit", MPN=CL21A106KAYNNNE, ReviewStatus="R4 reviewed package; see source and assembly audit", Supplier 1=LCSC
C26: library part R4_C26_100nF, Manufacturer=YAGEO, Manufacturer Part Number=CC0603KRX7R9BB104, Supplier Part Number 1=C14663, Datasheet=https://www.lcsc.com/datasheet/lcsc_datasheet_2211101700_YAGEO-CC0603KRX7R9BB104_C14663.pdf, Footprint Status="R4 reviewed package; see source and assembly audit", MPN=CC0603KRX7R9BB104, ReviewStatus="R4 reviewed package; see source and assembly audit", Supplier 1=LCSC
C27: library part R4_C27_22uF, Manufacturer="Samsung Electro-Mechanics", Manufacturer Part Number=CL31A226KAHNNNE, Supplier Part Number 1=C12891, Datasheet=https://www.lcsc.com/datasheet/lcsc_datasheet_2304140030_Samsung-Electro-Mechanics-CL31A226KAHNNNE_C12891.pdf, Footprint Status="R4 reviewed package; see source and assembly audit", MPN=CL31A226KAHNNNE, ReviewStatus="R4 reviewed package; see source and assembly audit", Supplier 1=LCSC
C28: library part R4_C28_100nF, Manufacturer=YAGEO, Manufacturer Part Number=CC0603KRX7R9BB104, Supplier Part Number 1=C14663, Datasheet=https://www.lcsc.com/datasheet/lcsc_datasheet_2211101700_YAGEO-CC0603KRX7R9BB104_C14663.pdf, Footprint Status="R4 reviewed package; see source and assembly audit", MPN=CC0603KRX7R9BB104, ReviewStatus="R4 reviewed package; see source and assembly audit", Supplier 1=LCSC
C29: library part R4_C29_10uF, Manufacturer="Samsung Electro-Mechanics", Manufacturer Part Number=CL21A106KAYNNNE, Supplier Part Number 1=C15850, Datasheet=https://www.lcsc.com/datasheet/lcsc_datasheet_2304140030_Samsung-Electro-Mechanics-CL21A106KAYNNNE_C15850.pdf, Footprint Status="R4 reviewed package; see source and assembly audit", MPN=CL21A106KAYNNNE, ReviewStatus="R4 reviewed package; see source and assembly audit", Supplier 1=LCSC
C30: library part R4_C30_100nF, Manufacturer=YAGEO, Manufacturer Part Number=CC0603KRX7R9BB104, Supplier Part Number 1=C14663, Datasheet=https://www.lcsc.com/datasheet/lcsc_datasheet_2211101700_YAGEO-CC0603KRX7R9BB104_C14663.pdf, Footprint Status="R4 reviewed package; see source and assembly audit", MPN=CC0603KRX7R9BB104, ReviewStatus="R4 reviewed package; see source and assembly audit", Supplier 1=LCSC
C31: library part R4_C31_100nF, Manufacturer=YAGEO, Manufacturer Part Number=CC0603KRX7R9BB104, Supplier Part Number 1=C14663, Datasheet=https://www.lcsc.com/datasheet/lcsc_datasheet_2211101700_YAGEO-CC0603KRX7R9BB104_C14663.pdf, Footprint Status="R4 reviewed package; see source and assembly audit", MPN=CC0603KRX7R9BB104, ReviewStatus="R4 reviewed package; see source and assembly audit", Supplier 1=LCSC
C32: library part R4_C32_22uF, Manufacturer="Samsung Electro-Mechanics", Manufacturer Part Number=CL31A226KAHNNNE, Supplier Part Number 1=C12891, Datasheet=https://www.lcsc.com/datasheet/lcsc_datasheet_2304140030_Samsung-Electro-Mechanics-CL31A226KAHNNNE_C12891.pdf, Footprint Status="R4 reviewed package; see source and assembly audit", MPN=CL31A226KAHNNNE, ReviewStatus="R4 reviewed package; see source and assembly audit", Supplier 1=LCSC
C33: library part R4_C33_22uF, Manufacturer="Samsung Electro-Mechanics", Manufacturer Part Number=CL31A226KAHNNNE, Supplier Part Number 1=C12891, Datasheet=https://www.lcsc.com/datasheet/lcsc_datasheet_2304140030_Samsung-Electro-Mechanics-CL31A226KAHNNNE_C12891.pdf, Footprint Status="R4 reviewed package; see source and assembly audit", MPN=CL31A226KAHNNNE, ReviewStatus="R4 reviewed package; see source and assembly audit", Supplier 1=LCSC
D1: library part R4_D1_SMBJ18A, Manufacturer=BORN, Manufacturer Part Number=SMBJ18A, Supplier Part Number 1=C152104, Datasheet=https://www.lcsc.com/datasheet/lcsc_datasheet_2304140030_BORN-SMBJ18A_C152104.pdf, Footprint Status="R4 reviewed package; see source and assembly audit", MPN=SMBJ18A, ReviewStatus="R4 reviewed package; see source and assembly audit", Supplier 1=LCSC
D2: library part R4_D2_SS14, Manufacturer="MDD(Microdiode Semiconductor)", Manufacturer Part Number=SS14, Supplier Part Number 1=C2480, Datasheet=https://www.lcsc.com/datasheet/lcsc_datasheet_2407101109_MDD-Microdiode-Semiconductor-SS14_C2480.pdf, Footprint Status="R4 reviewed package; see source and assembly audit", MPN=SS14, ReviewStatus="R4 reviewed package; see source and assembly audit", Supplier 1=LCSC
D3: library part R4_D3_PESD2CAN24T_Q, Manufacturer=Nexperia, Manufacturer Part Number=PESD2CAN24T-QR, Supplier Part Number 1=C28933048, Datasheet=https://assets.nexperia.com/documents/data-sheet/PESD2CAN24T-Q.pdf, Footprint Status="R4 reviewed package; see source and assembly audit", MPN=PESD2CAN24T-QR, ReviewStatus="R4 reviewed package; see source and assembly audit", Supplier 1=LCSC
D4: library part R4_D4_SS14, Manufacturer="MDD(Microdiode Semiconductor)", Manufacturer Part Number=SS14, Supplier Part Number 1=C2480, Datasheet=https://www.lcsc.com/datasheet/lcsc_datasheet_2407101109_MDD-Microdiode-Semiconductor-SS14_C2480.pdf, Footprint Status="R4 reviewed package; see source and assembly audit", MPN=SS14, ReviewStatus="R4 reviewed package; see source and assembly audit", Supplier 1=LCSC
D5: library part R4_D5_SS26, Manufacturer="MDD(Microdiode Semiconductor)", Manufacturer Part Number=SS26, Supplier Part Number 1=C14238, Datasheet=https://www.lcsc.com/datasheet/lcsc_datasheet_2407101107_MDD-Microdiode-Semiconductor-SS26_C14238.pdf, Footprint Status="R4 reviewed package; see source and assembly audit", MPN=SS26, ReviewStatus="R4 reviewed package; see source and assembly audit", Supplier 1=LCSC
D6: library part R4_D6_USBLC6_2SC6, Manufacturer=STMicroelectronics, Supplier Part Number 1=C7519, Datasheet=https://www.lcsc.com/datasheet/lcsc_datasheet_2410121836_STMicroelectronics-USBLC6-2SC6_C7519.pdf, Footprint Status="R4 reviewed package; see source and assembly audit", Manufacturer Part Number=USBLC6-2SC6, MPN=USBLC6-2SC6, ReviewStatus="R4 reviewed package; see source and assembly audit", Supplier 1=LCSC
F1: library part R4_F1_T0.8A, "0.8 A slow-blow SMD ceramic fuse, 63 VDC, 50 A interrupt rating", Manufacturer=BOURNS, Manufacturer Part Number=SF-1206S080-2, Supplier Part Number 1=C3032873, Datasheet=https://wmsc.lcsc.com/wmsc/upload/file/pdf/v2/lcsc/2304140030_BOURNS-SF-1206S080-2_C3032873.pdf, Footprint Status="R4 reviewed package; see source and assembly audit", MPN=SF-1206S080-2, ReviewStatus="R4 reviewed package; see source and assembly audit", Supplier 1=LCSC
J1: library part R4_J1_NMEA, "Five direct wire-solder pads for a separately selected Micro-C cable; this is a PCB interface, not an invented connector MPN or face view", Footprint Status="R4 reviewed package; see source and assembly audit", ReviewStatus="R4 reviewed package; see source and assembly audit"
J2: library part R4_J2_TYPE_C_31_M_12, Manufacturer="Korean Hroparts Elec", Supplier Part Number 1=C165948, Datasheet=https://www.lcsc.com/datasheet/lcsc_datasheet_2205251630_Korean-Hroparts-Elec-TYPE-C-31-M-12_C165948.pdf, Footprint Status="R4 reviewed package; see source and assembly audit", Manufacturer Part Number=TYPE-C-31-M-12, MPN=TYPE-C-31-M-12, ReviewStatus="R4 reviewed package; see source and assembly audit", Supplier 1=LCSC
L1: library part R4_L1_ACT45B_510_2P_TL003, Manufacturer=TDK, Supplier Part Number 1=C76584, Datasheet=https://www.lcsc.com/datasheet/lcsc_datasheet_1811151430_TDK-ACT45B-510-2P-TL003_C76584.pdf, Footprint Status="R4 reviewed package; see source and assembly audit", Manufacturer Part Number=ACT45B-510-2P-TL003, MPN=ACT45B-510-2P-TL003, ReviewStatus="R4 reviewed package; see source and assembly audit", Supplier 1=LCSC
L2: library part R4_L2_4.7uH, Manufacturer=Sunlord, Manufacturer Part Number=SWPA4030S4R7MT, Supplier Part Number 1=C57269, Datasheet=https://www.lcsc.com/datasheet/lcsc_datasheet_2310251551_Sunlord-SWPA4030S4R7MT_C57269.pdf, Footprint Status="R4 reviewed package; see source and assembly audit", MPN=SWPA4030S4R7MT, ReviewStatus="R4 reviewed package; see source and assembly audit", Supplier 1=LCSC
L3: library part R4_L3_4.7uH, Manufacturer=Sunlord, Manufacturer Part Number=SWPA4030S4R7MT, Supplier Part Number 1=C57269, Datasheet=https://www.lcsc.com/datasheet/lcsc_datasheet_2310251551_Sunlord-SWPA4030S4R7MT_C57269.pdf, Footprint Status="R4 reviewed package; see source and assembly audit", MPN=SWPA4030S4R7MT, ReviewStatus="R4 reviewed package; see source and assembly audit", Supplier 1=LCSC
MCU1: library part R4_MCU1_ESP32_C3_WROOM_02_N4, Manufacturer="Espressif Systems", Supplier Part Number 1=C2934560, Datasheet=https://documentation.espressif.com/esp32-c3-wroom-02_datasheet_en.pdf, Footprint Status="R4 reviewed package; see source and assembly audit", Manufacturer Part Number=ESP32-C3-WROOM-02-N4, MPN=ESP32-C3-WROOM-02-N4, ReviewStatus="R4 reviewed package; see source and assembly audit", Supplier 1=LCSC
R2: library part R4_R2_10k, "10k - generic specification; manufacturer/MPN not selected", Manufacturer="UNI-ROYAL(Uniroyal Elec)", Manufacturer Part Number=0603WAF1002T5E, Supplier Part Number 1=C25804, Datasheet=https://www.lcsc.com/datasheet/lcsc_datasheet_2206010045_UNI-ROYAL-Uniroyal-Elec-0603WAF1002T5E_C25804.pdf, Footprint Status="R4 reviewed package; see source and assembly audit", MPN=0603WAF1002T5E, ReviewStatus="R4 reviewed package; see source and assembly audit", Supplier 1=LCSC
R3: library part R4_R3_33R, "33R - generic specification; manufacturer/MPN not selected", Manufacturer="UNI-ROYAL(Uniroyal Elec)", Manufacturer Part Number=0603WAF330JT5E, Supplier Part Number 1=C23140, Datasheet=https://www.lcsc.com/datasheet/lcsc_datasheet_2206010116_UNI-ROYAL-Uniroyal-Elec-0603WAF330JT5E_C23140.pdf, Footprint Status="R4 reviewed package; see source and assembly audit", MPN=0603WAF330JT5E, ReviewStatus="R4 reviewed package; see source and assembly audit", Role=R_TX, Supplier 1=LCSC
R4: library part R4_R4_33R, "33R - generic specification; manufacturer/MPN not selected", Manufacturer="UNI-ROYAL(Uniroyal Elec)", Manufacturer Part Number=0603WAF330JT5E, Supplier Part Number 1=C23140, Datasheet=https://www.lcsc.com/datasheet/lcsc_datasheet_2206010116_UNI-ROYAL-Uniroyal-Elec-0603WAF330JT5E_C23140.pdf, Footprint Status="R4 reviewed package; see source and assembly audit", MPN=0603WAF330JT5E, ReviewStatus="R4 reviewed package; see source and assembly audit", Role=R_RX, Supplier 1=LCSC
R5: library part R4_R5_10k, Manufacturer="UNI-ROYAL(Uniroyal Elec)", Manufacturer Part Number=0603WAF1002T5E, Supplier Part Number 1=C25804, Datasheet=https://www.lcsc.com/datasheet/lcsc_datasheet_2206010045_UNI-ROYAL-Uniroyal-Elec-0603WAF1002T5E_C25804.pdf, Footprint Status="R4 reviewed package; see source and assembly audit", MPN=0603WAF1002T5E, ReviewStatus="R4 reviewed package; see source and assembly audit", Supplier 1=LCSC
R6: library part R4_R6_10k, Manufacturer="UNI-ROYAL(Uniroyal Elec)", Manufacturer Part Number=0603WAF1002T5E, Supplier Part Number 1=C25804, Datasheet=https://www.lcsc.com/datasheet/lcsc_datasheet_2206010045_UNI-ROYAL-Uniroyal-Elec-0603WAF1002T5E_C25804.pdf, Footprint Status="R4 reviewed package; see source and assembly audit", MPN=0603WAF1002T5E, ReviewStatus="R4 reviewed package; see source and assembly audit", Supplier 1=LCSC
R7: library part R4_R7_10k, Manufacturer="UNI-ROYAL(Uniroyal Elec)", Manufacturer Part Number=0603WAF1002T5E, Supplier Part Number 1=C25804, Datasheet=https://www.lcsc.com/datasheet/lcsc_datasheet_2206010045_UNI-ROYAL-Uniroyal-Elec-0603WAF1002T5E_C25804.pdf, Footprint Status="R4 reviewed package; see source and assembly audit", MPN=0603WAF1002T5E, ReviewStatus="R4 reviewed package; see source and assembly audit", Supplier 1=LCSC
R8: library part R4_R8_10k, Manufacturer="UNI-ROYAL(Uniroyal Elec)", Manufacturer Part Number=0603WAF1002T5E, Supplier Part Number 1=C25804, Datasheet=https://www.lcsc.com/datasheet/lcsc_datasheet_2206010045_UNI-ROYAL-Uniroyal-Elec-0603WAF1002T5E_C25804.pdf, Footprint Status="R4 reviewed package; see source and assembly audit", MPN=0603WAF1002T5E, ReviewStatus="R4 reviewed package; see source and assembly audit", Supplier 1=LCSC
R9: library part R4_R9_5.1k, Manufacturer="UNI-ROYAL(Uniroyal Elec)", Manufacturer Part Number=0603WAF5101T5E, Supplier Part Number 1=C23186, Datasheet=https://www.lcsc.com/datasheet/lcsc_datasheet_2206010116_UNI-ROYAL-Uniroyal-Elec-0603WAF5101T5E_C23186.pdf, Footprint Status="R4 reviewed package; see source and assembly audit", MPN=0603WAF5101T5E, ReviewStatus="R4 reviewed package; see source and assembly audit", Supplier 1=LCSC
R10: library part R4_R10_5.1k, Manufacturer="UNI-ROYAL(Uniroyal Elec)", Manufacturer Part Number=0603WAF5101T5E, Supplier Part Number 1=C23186, Datasheet=https://www.lcsc.com/datasheet/lcsc_datasheet_2206010116_UNI-ROYAL-Uniroyal-Elec-0603WAF5101T5E_C23186.pdf, Footprint Status="R4 reviewed package; see source and assembly audit", MPN=0603WAF5101T5E, ReviewStatus="R4 reviewed package; see source and assembly audit", Supplier 1=LCSC
R11: library part R4_R11_22R, Manufacturer="UNI-ROYAL(Uniroyal Elec)", Manufacturer Part Number=0603WAF220JT5E, Supplier Part Number 1=C23345, Datasheet=https://www.lcsc.com/datasheet/lcsc_datasheet_2206010100_UNI-ROYAL-Uniroyal-Elec-0603WAF220JT5E_C23345.pdf, Footprint Status="R4 reviewed package; see source and assembly audit", MPN=0603WAF220JT5E, ReviewStatus="R4 reviewed package; see source and assembly audit", Supplier 1=LCSC
R12: library part R4_R12_22R, Manufacturer="UNI-ROYAL(Uniroyal Elec)", Manufacturer Part Number=0603WAF220JT5E, Supplier Part Number 1=C23345, Datasheet=https://www.lcsc.com/datasheet/lcsc_datasheet_2206010100_UNI-ROYAL-Uniroyal-Elec-0603WAF220JT5E_C23345.pdf, Footprint Status="R4 reviewed package; see source and assembly audit", MPN=0603WAF220JT5E, ReviewStatus="R4 reviewed package; see source and assembly audit", Supplier 1=LCSC
R20: library part R4_R20_150R, Manufacturer="SEI(Stackpole Elec)", Manufacturer Part Number=RNCP1206FTD150R, Supplier Part Number 1=C4258541, Datasheet=https://wmsc.lcsc.com/wmsc/upload/file/pdf/v2/lcsc/2404111532_SEI-Stackpole-Elec-RNCP1206FTD150R_C4258541.pdf, Footprint Status="R4 reviewed package; see source and assembly audit", MPN=RNCP1206FTD150R, ReviewStatus="R4 reviewed package; see source and assembly audit", Supplier 1=LCSC
R21: library part R4_R21_150R, Manufacturer="SEI(Stackpole Elec)", Manufacturer Part Number=RNCP1206FTD150R, Supplier Part Number 1=C4258541, Datasheet=https://wmsc.lcsc.com/wmsc/upload/file/pdf/v2/lcsc/2404111532_SEI-Stackpole-Elec-RNCP1206FTD150R_C4258541.pdf, Footprint Status="R4 reviewed package; see source and assembly audit", MPN=RNCP1206FTD150R, ReviewStatus="R4 reviewed package; see source and assembly audit", Supplier 1=LCSC
SW1: library part R4_SW1_TS_1088_AR02016, Manufacturer=XUNPU, Supplier Part Number 1=C720477, Datasheet=https://www.lcsc.com/datasheet/lcsc_datasheet_2304140030_XUNPU-TS-1088-AR02016_C720477.pdf, Footprint Status="R4 reviewed package; see source and assembly audit", Manufacturer Part Number=TS-1088-AR02016, MPN=TS-1088-AR02016, ReviewStatus="R4 reviewed package; see source and assembly audit", Supplier 1=LCSC
SW2: library part R4_SW2_TS_1088_AR02016, Manufacturer=XUNPU, Supplier Part Number 1=C720477, Datasheet=https://www.lcsc.com/datasheet/lcsc_datasheet_2304140030_XUNPU-TS-1088-AR02016_C720477.pdf, Footprint Status="R4 reviewed package; see source and assembly audit", Manufacturer Part Number=TS-1088-AR02016, MPN=TS-1088-AR02016, ReviewStatus="R4 reviewed package; see source and assembly audit", Supplier 1=LCSC
TP1: library part R4_TP1_Shield, "Shield / chassis pad - generic specification; manufacturer/MPN not selected", Footprint Status="R4 reviewed package; see source and assembly audit", ReviewStatus="R4 reviewed package; see source and assembly audit"
U1: library part R4_U1_ISO1042DWV, Manufacturer="Texas Instruments", Manufacturer Part Number=ISO1042DWVR, Supplier Part Number 1=C2671714, Datasheet=https://datasheet.lcsc.com/lcsc/2302212001_Texas-Instruments-ISO1042DWVR_C2671714.pdf, Footprint Status="R4 reviewed package; see source and assembly audit", MPN=ISO1042DWVR, ReviewStatus="R4 reviewed package; see source and assembly audit", Supplier 1=LCSC
U2: library part R4_U2_B0505S_3WR2, Manufacturer=EVISUN, Supplier Part Number 1=C7500927, Datasheet=https://wmsc.lcsc.com/wmsc/upload/file/pdf/v2/lcsc/2308311627_EVISUN-B0505S-3WR2_C7500927.pdf, Footprint Status="R4 reviewed package; see source and assembly audit", Manufacturer Part Number=B0505S-3WR2, MPN=B0505S-3WR2, ReviewStatus="R4 reviewed package; see source and assembly audit", Supplier 1=LCSC
U3: library part R4_U3_AP63205WU_7, Manufacturer="Diodes Incorporated", Supplier Part Number 1=C2071056, Datasheet=https://www.lcsc.com/datasheet/lcsc_datasheet_2210280930_Diodes-Incorporated-AP63205WU-7_C2071056.pdf, Footprint Status="R4 reviewed package; see source and assembly audit", Manufacturer Part Number=AP63205WU-7, MPN=AP63205WU-7, ReviewStatus="R4 reviewed package; see source and assembly audit", Supplier 1=LCSC
U4: library part R4_U4_AP63203WU_7, Manufacturer="Diodes Incorporated", Supplier Part Number 1=C780769, Datasheet=https://www.lcsc.com/datasheet/lcsc_datasheet_2201131130_Diodes-Incorporated-AP63203WU-7_C780769.pdf, Footprint Status="R4 reviewed package; see source and assembly audit", Manufacturer Part Number=AP63203WU-7, MPN=AP63203WU-7, ReviewStatus="R4 reviewed package; see source and assembly audit", Supplier 1=LCSC

## Free pads (board coordinates)
  round 86.61 hole 86.61 unplated paste-99999 mask+1.97: ""(118.11,118.11) ""(118.11,1141.73)

## Via types
v1: diameter 23.62, hole 11.81, Top Layer to Bottom Layer, tented both sides, 41 vias

## Nets (pads, with @x,y where several pads share a name; then routed paths per layer and width w, separated by ;. In a path a pad name is that pad's centre, name@x,y a point inside that pad or via, vN(x,y) a via of type N, cw(c..) or ccw(c..) an arc to the next point about the centre after c; other vN are vias at no path point)
3V3_LOGIC: C5.1 C11.1 C12.1 C32.1 C33.1 L3.2 MCU1.1 R2.1 R5.1 R6.1 R7.1 R8.1 U1.1 U4.1 | length 2738.3
  Top Layer w7.87: v1(1102.36,494.09) U4.1
  Top Layer w9.84: C32.1 v1(909.45,492.13) ; v1(1401.57,643.7) R7.1
  Top Layer w19.68: C33.1 C32.1 864.17,507.87 881.89,525.59 L3.2 ; 885.83,484.25 901.57,484.25 v1(909.45,492.13) ; v1(897.64,858.27) R5.1@897.64,1074.8 ; R5.1@909.45,1106.3 921.26,1118.11 921.26,1153.54 ; C5.1@948.82,732.28 U1.1@948.82,799.21 ; v1@956.69,751.97 v1(960.63,751.97) ; C11.1@964.57,1196.85 C12.1@980.32,1196.85 ; C12.1@1011.81,1200.79 1023.62,1200.79 ; v1(1236.22,562.99) 1236.22,574.8 R2.1@1251.97,590.55 ; v1(1488.19,637.8) 1500,649.61 R8.1@1500,661.42 ; R6.1@1814.96,1157.48 1826.77,1145.67 v1(1834.65,1145.67)
  Bottom Layer w7.87: v1(909.45,492.13) 1043.31,494.09 v1(1102.36,494.09)
  Bottom Layer w19.68: v1(897.64,858.27) 952.76,803.15 v1@952.76,759.84 ; v1(909.45,492.13) 952.76,492.13 ; 960.63,496.06 v1(960.63,751.97) ; v1@1110.24,500 1161.42,500 1224.41,562.99 v1(1236.22,562.99) ; v1@1244.09,555.12 1354.33,444.88 1393.7,444.88 1413.39,464.57 1413.39,488.19 1405.51,496.06 v1@1405.51,633.86 ; 1413.39,637.8 v1(1488.19,637.8) ; v1@1496.06,645.67 1496.06,807.09 v1(1834.65,1145.67)
5V_BUS: C4.1 C22.1 C23.1 C25.1 C26.1 L2.2 U1.8 U2.1 U3.1 | length 1165
  Top Layer w7.87: v1(393.7,354.33) U3.1
  Top Layer w11.81: v1(314.96,196.85) C23.1
  Top Layer w19.68: L2.2 236.22,291.34 C22.1 C23.1 C25.1 538.19,238.19 U2.1 ; C4.1@551.18,751.97 U1.8@551.18,799.21 ; C4.1@570.87,720.47 570.87,610.24 594.49,586.61 594.49,358.27 C26.1@602.36,350.39 ; 598.43,299.21 602.36,303.15 C26.1@602.36,318.9
  Bottom Layer w7.87: v1(314.96,196.85) 314.96,212.6 393.7,291.34 v1(393.7,354.33)
5V_ISO: C27.1 C28.1 D2.2 R20.1 R21.1 U2.6 | length 315.4
  Top Layer w19.68: U2.6@1055.12,295.28 C27.1@1055.12,314.96 ; C27.1@1082.68,354.33 C28.1@1094.49,366.14 ; C28.1@1129.92,366.14 D2.2@1141.73,366.14 ; D2.2@1196.85,354.33 1224.41,354.33 R21.1@1267.72,311.02 ; 1267.72,240.16 1255.91,228.35 1255.91,133.86 1275.59,114.17 R20.1@1275.59,74.8
5V_SYS: C29.1 C30.1 D2.1 D4.1 U4.2 U4.3 | length 172.4
  Top Layer w15.75: U4.2 U4.3 C29.1
  Top Layer w19.68: C29.1@1263.78,511.81 C30.1@1263.78,523.62 ; C29.1@1283.46,456.69 1295.28,444.88 D2.1@1295.28,417.32 ; 1354.33,354.33 D4.1@1366.14,354.33
BST_BUS: C24.1 U3.6 | length 48.9
  Top Layer w7.87: C24.1 U3.6
BST_LOGIC: C31.1 U4.6 | length 47.6
  Top Layer w7.87: C31.1 U4.6
BUS_PROT: C20.1 C21.1 D1.1 D5.1 U3.2 U3.3 | length 239.7
  Top Layer w15.75: U3.2 U3.3 C20.1
  Top Layer w19.68: D5.1@452.76,614.17 D1.1@452.76,685.04 ; D5.1@468.5,551.18 C21.1@519.68,551.18 ; C20.1@531.5,468.5 C21.1@531.5,476.38
CANH: L1.4 U1.7 | length 401.4
  Top Layer w7.87: L1.4 279.53,997.05 279.53,937.01 334.65,881.89 532.09,881.89 U1.7
CANH_EXT: D3.1 J1.4 L1.1 | length 254.7
  Top Layer w7.87: J1.4 179.13,748.03 D3.1 305.12,818.9 L1.1
CANL: L1.3 U1.6 | length 214.1
  Top Layer w7.87: L1.3 484.25,941.93 484.25,910.83 U1.6
CANL_EXT: D3.2 J1.5 L1.2 | length 448.9
  Top Layer w7.87: J1.5 D3.2 v1(255.91,891.73) ; L1.2 v1(440.94,843.5)
  Bottom Layer w7.87: v1(255.91,891.73) 393.7,891.73 v1(440.94,843.5)
ESP_BOOT: MCU1.8 R8.2 SW1.1 | length 603.6
  Top Layer w7.87: 1082.68,787.4 v1(1165.35,787.4) ; v1(1460.63,787.4) R8.2@1555.12,692.91 ; R8.2@1586.61,661.42 1586.61,641.73 1637.8,590.55
  Bottom Layer w7.87: v1(1165.35,787.4) v1(1460.63,787.4)
ESP_EN: C10.1 MCU1.2 R5.2 SW2.1 | length 904.1
  Top Layer w7.87: v1(956.69,1051.18) R5.2@956.69,1074.8 ; R5.2@972.44,1082.68 C10.1@980.32,1082.68 ; 1082.68,1141.73 1094.49,1129.92 v1(1098.43,1129.92) ; 1098.43,1118.11 1433.07,783.46 1433.07,637.8 1405.51,610.24 1405.51,590.55
  Bottom Layer w7.87: v1(956.69,1051.18) 1035.43,1129.92 v1(1098.43,1129.92)
ESP_GPIO2: MCU1.16 R6.2 | length 11.8
  Top Layer w7.87: MCU1.16@1771.65,1094.49 R6.2@1783.46,1094.49
ESP_GPIO8: MCU1.7 R7.2 | length 458.4
  Top Layer w7.87: 1082.68,846.46 v1(1106.3,822.83) ; R7.2@1460.63,696.85 v1(1460.63,716.54)
  Bottom Layer w7.87: v1(1106.3,822.83) 1106.3,811.02 1200.79,716.54 v1(1460.63,716.54)
FUSED_IN: D5.2 F1.2 | length 7.9
  Top Layer w19.68: F1.2@248.03,594.49 D5.2@255.91,594.49
GND_BUS: C4.2 C20.2 C21.2 C22.2 C23.2 C25.2 C26.2 D1.2 D3.3 J1.3 U1.5 U2.2 U3.4 | length 1882.6
  Top Layer w15.75: v1(272.64,78.74) C22.2 ; U3.4 v1(500,478.35) ; v1(625.98,413.39) C20.2
  Top Layer w19.68: D3.3@188.98,795.28 v1(224.41,795.28) ; C22.2 C23.2 ; D1.2@374.02,685.04 v1(421.26,637.8) ; 389.76,149.61 437.01,196.85 586.61,196.85 U2.2@641.73,251.97 ; C25.2@456.69,318.9 v1(480.31,318.9) ; U1.5@586.61,952.76 610.24,929.13 C4.2@610.24,751.97 ; C4.2@633.86,720.47 633.86,598.43 645.67,586.61 ; C20.2@645.67,468.5 C21.2@645.67,476.38 ; U2.2@665.35,295.28 C26.2@665.35,318.9 ; C26.2@665.35,350.39 C20.2@665.35,358.27
  Bottom Layer w19.68: J1.3@118.11,669.29 118.11,677.17 224.41,783.46 ; v1(224.41,795.28) 251.97,795.28 v1@409.45,637.8 ; v1(421.26,637.8) 421.26,562.99 v1@496.06,488.19 ; v1(480.31,318.9) 555.12,393.7 555.12,421.26 ; v1(500,478.35) 555.12,431.1 608.27,431.1 v1(625.98,413.39)
GND_LOGIC: C5.2 C10.2 C11.2 C12.2 C27.2 C28.2 C29.2 C30.2 C32.2 C33.2 D6.2 J2.A1_B12 J2.B1_A12 J2.S1 J2.S2 J2.S3 J2.S4 MCU1.9 MCU1.19 R9.2 R10.2 R20.2 R21.2 SW1.2 SW2.2 U1.4 U2.4 U4.4 | length 3551.4
  Top Layer w7.87: v1(960.63,1129.92) C12.2 ; D6.2 1655.71,383.86 v1(1736.22,383.86)
  Top Layer w15.75: C32.2 C33.2 v1(1000,305.12) ; U4.4 v1(1230.32,614.17) ; C29.2 v1(1381.89,476.38)
  Top Layer w19.68: v1(889.76,1133.86) 889.76,1153.54 ; U2.4@897.64,275.59 956.69,334.65 ; U1.4@960.63,972.44 v1(960.63,1003.94) ; v1@964.57,1011.81 C10.2@980.32,1027.56 ; v1(1000,755.91) 1023.62,755.91 ; C32.2@1003.94,433.07 1015.75,433.07 ; C5.2@1011.81,728.35 1023.62,728.35 ; v1(1019.68,519.68) 1019.68,507.87 1066.93,460.63 C28.2@1094.49,460.63 ; 1082.68,759.84 v1(1102.36,759.84) ; v1(1291.34,960.63) MCU1.19@1381.89,960.63 ; C29.2@1322.83,511.81 1322.83,523.62 ; R20.2@1338.58,145.67 1338.58,125.98 1354.33,110.24 R9.2@1362.2,110.24 ; R20.2@1342.52,192.91 1358.27,192.91 R10.2@1362.2,196.85 ; R10.2@1385.83,228.35 1385.83,240.16 ; v1@1389.76,476.38 1444.88,421.26 1444.88,342.52 1433.07,330.71 R21.2@1433.07,311.02 ; 1433.07,240.16 J2.S1@1468.5,240.16 ; 1452.76,421.26 1543.31,511.81 ; J2.S1@1503.94,251.97 J2.A1_B12@1519.68,251.97 ; J2.B1_A12@1791.34,287.4 J2.S2@1807.09,287.4 ; 1814.96,291.34 1814.96,511.81
  Bottom Layer w19.68: v1(889.76,1133.86) v1@952.76,1133.86 ; v1@952.76,1011.81 925.2,1039.37 925.2,1062.99 960.63,1098.43 960.63,1118.11 ; v1(960.63,1003.94) 960.63,1007.87 980.32,1027.56 1003.94,1027.56 1074.8,956.69 1074.8,787.4 v1(1102.36,759.84) ; v1(1000,755.91) 1153.54,602.36 ; v1(1019.68,519.68) 1082.68,519.68 1173.23,610.24 v1@1220.47,610.24 ; 1082.68,960.63 v1(1291.34,960.63) ; v1(1230.32,614.17) 1368.11,476.38 v1(1381.89,476.38) ; J2.S3@1468.5,118.11 1460.63,118.11 1425.2,153.54 1425.2,177.17 1456.69,208.66 J2.S1@1468.5,208.66 ; J2.S1@1503.94,287.4 1594.49,377.95 v1@1728.35,377.95 ; 1724.41,370.08 J2.S2@1807.09,287.4 ; J2.S4@1807.09,118.11 J2.S2@1807.09,208.66
GPIO6: MCU1.5 R3.1 | length 606.4
  Top Layer w7.87: v1(992.13,996.06) 1023.62,996.06 ; R3.1@1204.72,661.42 1208.66,657.48 v1(1208.66,641.73)
  Bottom Layer w7.87: v1(992.13,996.06) 901.57,905.51 901.57,889.76 1129.92,661.42 1188.98,661.42 v1(1208.66,641.73)
GPIO7: MCU1.6 R4.2 | length 346.3
  Top Layer w7.87: 1082.68,905.51 1275.59,712.6 1326.77,712.6 R4.2@1342.52,696.85
NET_S: F1.1 J1.2 | length 43.3
  Top Layer w19.68: J1.2@141.73,500 F1.1@185.04,500
RXD: R4.1 U1.3 | length 630.9
  Top Layer w7.87: v1(929.13,897.64) 944.88,897.64 U1.3@948.82,901.57 ; R4.1@1311.02,661.42 1318.9,661.42 1338.58,641.73 1362.2,641.73 v1(1366.14,637.8)
  Bottom Layer w7.87: v1(929.13,897.64) 1129.92,696.85 1307.09,696.85 v1(1366.14,637.8)
SHIELD: J1.1 TP1.1 | length 55.1
  Top Layer w7.87: 98.43,295.28 J1.1@98.43,350.39
SW_BUS: C24.2 L2.1 U3.5 | length 200.6
  Top Layer w15.75: U3.5 C24.2
  Top Layer w19.68: L2.1@354.33,372.05 393.7,411.42 452.76,411.42 U3.5
SW_LOGIC: C31.2 L3.1 U4.5 | length 196.9
  Top Layer w15.75: U4.5 C31.2
  Top Layer w19.68: L3.1 1102.36,551.18 1161.42,551.18 U4.5
TXD: R2.2 R3.2 U1.2 | length 642.8
  Top Layer w7.87: U1.2@948.82,850.39 948.82,846.46 850.39,748.03 913.39,685.04 1141.73,685.04 1169.29,712.6 1220.47,712.6 R3.2@1236.22,696.85 ; R3.2@1259.84,661.42 1275.59,645.67 1295.28,645.67 R2.2@1314.96,625.98
USB_CC1: J2.A5 R9.1 | length 309.6
  Top Layer w5.91: R9.1@1393.7,47.24 1452.76,106.3 1452.76,125.98 1527.56,200.79 1562.99,200.79 1606.3,244.09 J2.A5@1606.3,248.03
USB_CC2: J2.B5 R10.1 | length 367.3
  Top Layer w5.91: R10.1@1393.7,165.35 v1(1456.69,165.35) ; v1(1527.56,165.35) 1645.67,165.35 1724.41,244.09 J2.B5@1724.41,248.03
  Bottom Layer w5.91: v1(1456.69,165.35) v1(1527.56,165.35)
USB_DM: D6.6 R11.1 | length 602.6
  Top Layer w5.91: D6.6 1618.31,478.35 1740.16,478.35 1775.59,513.78 1775.59,661.42 1854.33,740.16 1854.33,846.46 R11.1
USB_DM_IN: D6.1 J2.A7 J2.B7 | length 156
  Top Layer w5.91: D6.1 1618.31,312.99 1626.18,305.12 ; J2.B7 1626.18,305.12 ; J2.A7 1665.55,305.12 1626.18,305.12
USB_DM_MCU: MCU1.13 R11.2 | length 96.7
  Top Layer w5.91: MCU1.13 R11.2
USB_DP: D6.4 R12.1 | length 719.6